# Altium PCB ESP32 with USBC  PCB V1I1.PcbDoc (part 3 of 3)
Units mil, origin at the board's own origin, x right, y up, seen from the top; angles counter-clockwise.
Board outline 2700 x 1000 mil, 4 copper layers (L1, L2, L3, L4), stack 61.581 mil thick; 64 components, 72 nets, 299 pads, 156 vias.
Unrouted connection lines stored in the file: 16.
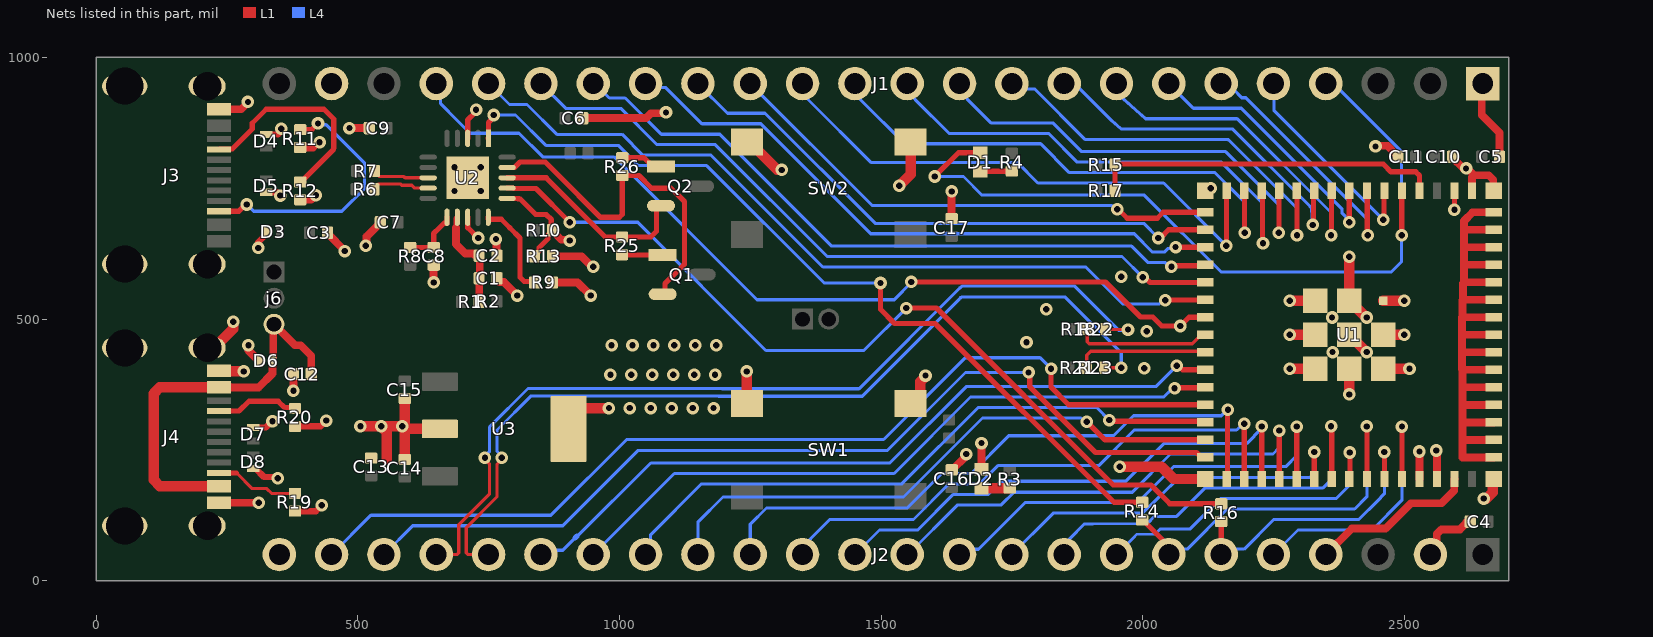
[diagram p4: the nets of this part, all layers, seen from the top]

## Via types
v1: diameter 24, hole 12, L1 to L4, tented both sides, 156 vias

## Nets (pads, with @x,y where several pads share a name; then routed paths per layer and width w, separated by ;. In a path a pad name is that pad's centre, name@x,y a point inside that pad or via, vN(x,y) a via of type N, cw(c..) or ccw(c..) an arc to the next point about the centre after c; other vN are vias at no path point) (continued)
CON_ESP_USB_N: J2.21 R22.1 | length 1727.3
  L1 w6.05: R22.1@1929.01,481 1930.01,480 v1(1972,480)
  L1 w6.23: J2.21@650,50 689.24,50 692.89,53.65 692.89,106.99 751.89,165.99 751.89,222.47 743,231.35 v1(743,235)
  L4 w6.23: v1(743,235) 743,238.65 751.89,247.53 751.89,293.89 825.34,367.34 1195.47,367.34 1195.9,366.92 1457.99,366.92 1650.5,559.43 cw(c1727.68,469.01) 1655.42,563.4 1869.6,563.4 1954.3,478.7 1970.7,478.7 v1(1972,480)
CON_ESP_USB_P: J2.20 R23.1 | length 1713.4
  L1 w6.23: J2.20@750,50 710.76,50 707.11,53.65 707.11,101.1 766.11,160.1 766.11,222.47 775,231.35 v1(775,235) ; R23.1@1927.02,407 v1(1959,407)
  L4 w6.23: v1(775,235) 775,238.65 766.11,247.53 766.11,287.99 831.24,353.11 1189.57,353.11 1190,352.69 1463.88,352.69 1647.32,536.12 ; 1647.35,536.15 1651.5,540.31 cw(c1655.89,535.89) 1655.89,542.11 1852.31,542.11 1959,435.43 v1(1959,407)
DTR_FTDI: Q2.2 R25.1 U2.18 | length 391
  L1 w10: 807.99,770.32 816.2,770.32 816.51,770 860,770 972.99,657.01 R25.1@1005,657.01 1060.01,657.01 1071,668 1071,710.28 1076.79,716.07 Q2.2@1080.1,716.07
  L1 w10.01: U2.18@785.41,770 807.67,770 807.99,770.32
ESP_USB_N: R18.2 R22.2 U1.23 | length 258.8
  L1 w6.23: R18.2@1895,481 1894,480 1894,456.65 1897.65,453 2094.57,453 2111.57,470 U1.23@2119.45,470
ESP_USB_P: R21.2 R23.2 U1.24 | length 254.6
  L1 w6.23: R21.2@1893,407 1893,431 1900.77,438.77 2117.21,438.77 U1.24@2119.45,436.54
FTDI_USB_N: R6.2 U2.9 | length 111.9
  L1 w6.23: R6.2@531.01,748 531.01,749.18 540.21,758.39 581.6,758.39 584.21,755.77 603.32,755.77 608.77,750.32 612.99,750.32 U2.9@634.59,750.32
FTDI_USB_P: R7.2 U2.8 | length 108.7
  L1 w6.23: R7.2@532.01,783 532.01,781.82 541.21,772.61 587.49,772.61 590.11,770 612.99,770 U2.8@634.59,770
GND: C1.2 C2.2 C3.2 C4.2 C5.2 C6.2 C7.2 C8.2 C9.2 C10.2 C11.2 C12.1 C12.2 C13.2 C14.2 C15.2 C16.2 C17.2 D2.2 D3.1 D4.1 D5.1 D6.1 D6.2 D7.1 D8.1 J1.1 J1.23 J2.2 J2.24 J3.A1B12 J3.S1 J3.S2 J3.S3 J3.S4 J4.+5V_VBUS2 J4.A1B12 J4.B1A12 J4.B4A9 J4.S1 J4.S2 J4.S3 J4.S4 j6.3 R9.2 R11.1 R12.1 R13.2 R19.1 R20.1 SW1.3 SW1.4 SW2.3 SW2.4 U1.1 U1.2 U1.42 U1.43 U1.46 U1.47 U1.48 U1.49 U1.50 U1.51 U1.52 U1.53 U1.54 U1.55 U1.56 U1.57 U1.58 U1.59 U1.60 U1.61 U1.62 U1.63 U1.64 U1.65 U1.66 U1.67 U1.68 U1.69 U1.70 U1.71 U1.72 U1.73 U2.3 U2.13 U2.21 U3.2 U3.4 | length 5788.2
  L1 w10: U1.2@2595.83,745.59 v1(2595.83,709.17) v1@2596,709
  L1 w10.01: U2.13@710,694.59 710.23,694.35 710.23,674.77 v1(730,655) ; U2.3@710,845.41 710,880.21 726,896.21 v1(726,900)
  L1 w12: D8.1@300,214.2 304.92,214.2 320.83,198.3 344.7,198.3 v1(347,196) ; v1(310,636) 310,646.87 325.2,662.08 D3.1@325.2,667 ; 312,292.8 324.43,292.8 336.63,305 v1(337,305) ; D5.1@325,742.2 345.8,742.2 v1(352,736) ; D4.1@325,852.8 346.97,852.8 354,859.82 v1(354,864) ; R19.1@380,132.99 420,133 v1(431,144) ; R20.1@380,295 428.99,295 v1(440,306.01)
  L1 w15: J4.B4A9@234.39,180.97 J4.B4A9@234.84,180.51 ; J4.B1A12@234.84,149.02 v1(310.98,149.02) ; J4.+5V_VBUS2@234.84,369.49 310.49,369.49 337.19,396.19 337.19,419.39 D6.2@337.8,420 338.41,420.61 338.41,488.41 j6.3@340,490 380,450 391,450 411.01,429.99 C12.1@411.01,395 ; J3.A1B12@234.84,900.98 277.06,900.98 290,913.93 v1(290,915) ; v1(291,450) 291,439.91 310.91,420 D6.1@312.2,420 ; v1(376.99,362.99) C12.2@376.99,395 ; R12.1@390,727.99 411.21,727.99 v1(420,736.78) ; R11.1@390.2,828.19 414.76,828.19 424.56,838 v1(427,838) ; C3.2@442.01,663.82 475,630.83 v1(475,630) ; v1(484,865) C9.2@521.99,865 ; v1(515,640) 516.72,641.72 516.72,657.55 539.86,680.69 539.86,681.87 C7.2@542.99,685 ; v1(645,570) C8.2@645,602.99 ; v1(764,653) 765,652 765,622 C2.2@766.01,621 ; C1.2@767.01,575 767.01,573.82 770.14,570.69 779.31,570.69 v1(805,545) ; R9.2@872.01,570 920,570 v1(945,545) ; R13.2@872.01,620 927.56,620 947.56,600 v1(950,600) ; C6.2@930.01,884 1051,884 1060.28,893.28 1087.28,893.28 v1(1089,895) ; C16.2@1635,212.01 1636.18,212.01 1661.28,237.1 1661.28,240.28 v1(1663,242) ; C17.2@1635,692.01 v1(1635,744) ; D2.2@1692,213 v1(1692,263) ; U1.63@2119.45,745.59 2125.59,745.59 v1(2130,750) ; v1(2445,830) 2446.36,831.36 2467.82,831.36 2484.86,814.31 2484.86,813.13 C11.2@2487.99,810 ; U1.42@2528.9,194.41 2528.9,246.9 v1(2529,247) ; J2.2@2550,50 2550,63.26 2562,75.26 2562,89.21 2570.79,98 2606.17,98 2618.99,110.82 C4.2@2618.99,112 ; v1(2561.18,248.82) 2562.36,247.64 U1.43@2562.36,194.41 ; C10.2@2592.01,810 2592.01,808.82 2612.83,788 v1(2618,788) 2620.44,788 2633.44,775 ; 2613.57,637.32 U1.58@2670.63,637.32 ; 2614.14,603.86 U1.57@2670.63,603.86 ; U1.1@2629.29,745.59 2629.38,745.68 2629.38,770.94 2633.44,775 ; J1.1@2650,950 2648,948 2648,890 2682.01,855.99 C5.2@2682.01,810 ; U1.65@2669,192.78 U1.65@2670.63,194.41 ; U1.46@2670.63,235.75 2611.25,235.75 2611.21,235.79 2611.21,269.21 ; U1.47@2670.63,269.21 2611.21,269.21 ; U1.48@2670.63,302.68 2611.32,302.68 ; U1.49@2670.63,336.14 2619.14,336.14 2619,336 2611,336 ; U1.50@2670.63,369.61 2611.39,369.61 2611,370 ; U1.51@2670.63,403.07 2612.07,403.07 2612,403 ; U1.52@2670.63,436.54 2610.46,436.54 ; U1.53@2670.63,470 2610,470 ; U1.54@2670.63,503.46 2611.54,503.46 2611,504 ; U1.55@2670.63,536.93 2612.07,536.93 ; U1.56@2670.63,570.39 2614.39,570.39 ; U1.59@2670.63,670.79 2614.21,670.79 2614,671 ; U1.60@2670.63,704.25 2630.66,704.25 2614,687.6 2614,671 ; U1.62@2670.63,745.59 2670,746.22 2670,766.21 2661.21,775 2633.44,775 ; 2610,470 2610,503 2611,504 ; 2610,470 2610,437 2610.46,436.54 ; 2610.46,436.54 2610.46,404.54 2612,403 ; 2611,336 2611,303 2611.32,302.68 ; 2611,336 2611,370 ; 2611,370 2611,402 2612,403 ; 2611,504 2611,535.86 2612.07,536.93 ; 2611.21,269.21 2611.21,302.57 2611.32,302.68 ; 2612.07,536.93 2612.07,568.07 2614.39,570.39 ; 2614,671 2614,570.79 2614.39,570.39
  L1 w20: J4.S1@212.2,445.08 225.78,445.08 262,481.3 v1(262,495) ; J4.B4A9@234.39,180.97 121.72,180.97 110,192.68 110,357.77 121.72,369.49 J4.+5V_VBUS2@234.84,369.49 J4.+5V_VBUS2@252.96,369.49 ; J4.A1B12@234.84,400.98 235.83,400 v1(282,400) ; v1@505.77,294.23 v1(505,295) v1(545,295) ; 555,232.01 555,283.92 545,293.92 v1(545,295) ; v1@585.77,294.68 586.08,295 591.08,290 U3.2@656.97,290 ; v1@585.77,295.32 585.77,296.85 590,301.08 C15.2@590,347.99 ; C14.2@590,232.01 590,288.92 585,293.92 v1(585,295) v1(545,295) ; U3.4@903.03,290 903.03,305.55 927.48,330 950,330 v1(980,330) ; SW1.4@1243.5,338.58 v1(1243.5,400) ; SW2.4@1243.5,838.58 1248.43,838.58 1301.24,785.77 1309.23,785.77 v1(1310,785) ; v1(1535,755) 1556.5,776.5 SW2.3@1556.5,838.58 ; SW1.3@1556.5,338.58 1559.13,338.58 1574.72,354.17 1574.72,380.64 1585,390.92 v1(1585,392) ; v1(1956,218) 2036,218 2059.59,194.41 U1.64@2119.45,194.41 ; v1(2281,405) v1(2281,405) U1.73@2330.08,405.04 ; v1(2281,470) U1.72@2330.08,470 ; v1(2281,535) v1(2281,535) U1.71@2330.08,534.96 ; v1(2395,356) v1(2395,356) U1.70@2395.04,405.04 ; U1.69@2395.04,470 v1(2428,437) ; v1(2395,619) U1.68@2395.04,534.96 2427,503 v1(2428,503) ; U1.67@2460,405.04 v1(2510,405) v1(2510,405) ; U1.66@2460,470 v1(2500,470) ; U1.61@2460,534.96 v1(2500,534.96) ; v1(2652,157) 2657,157 2669,169 U1.65@2669,192.78
  other v1: 1020,330 1060,330 1100,330 1140,330 1180,330 982.91,393.74 1022.91,393.74 1062.91,393.74 1102.91,393.74 1142.91,393.74 1182.91,393.74 2003,406 2363,437 985,450 1025,450 1065,450 1105,450 1145,450 1185,450 1778,456 2008,477 2362,503 1816,519 1959,581 685,745 735,745 685,790 735,790
GPIO0: R15.2 R17.2 U1.4 | length 670.8
  L1 w10: R17.2@1947.01,745 1947.01,796.18 2459.71,796.18 2474.53,781.36 2521.83,781.36 2528.9,774.29 U1.4@2528.9,745.59
GPIO1: D1.2 J1.4 U1.5 | length 1577.3
  L1 w10: v1(1602.5,772.5) 1648,818 D1.2@1690,818 ; v1(2495,660) 2495.22,660.22 2495.22,745.37 U1.5@2495.43,745.59
  L4 w6: v1(1602.5,772.5) 1657.5,772.5 1693,737 2003,737 2150,590 2475,590 2495,610 2495,820 2380.73,934.27 2380.35,934.27 2364.61,950 J1.4@2350,950
GPIO2: J1.5 U1.6 | length 411.3
  L1 w10: v1(2460,690) 2460.98,690.98 2460.98,744.61 U1.6@2461.97,745.59
  L4 w6: J1.5@2250,950 2260.33,939.67 2250.79,930.12 2250.79,899.21 v1(2460,690)
GPIO3: J1.6 U1.7 | length 503.9
  L1 w10: U1.7@2428.5,745.59 2429.25,744.84 2429.25,660.75 v1(2430,660)
  L4 w6: J1.6@2150,950 2160.33,939.67 2172.8,939.67 2189.47,923 2197,923 2428,692 2428,662 v1(2430,660)
GPIO4: J1.7 U1.8 | length 522.2
  L1 w10: v1(2395,685) U1.8@2395.04,745.59
  L4 w6: J1.7@2050,950 2097,903 2188.72,903 2380.79,710.93 2380.79,703 2395,688.79 v1(2395,685)
GPIO5: J1.8 U1.9 | length 650.5
  L1 w10: v1(2360,660) 2360.79,660.79 2360.79,744.8 U1.9@2361.57,745.59
  L4 w6: J1.8@1950,950 1951.2,931.29 1954.09,928.4 1986.35,900.02 2005.88,883 2180.43,883 2360.79,702.64 2360.79,660.79 v1(2360,660)
GPIO6: J1.9 U1.10 | length 669.3
  L1 w10: v1(2325,680) 2326.56,681.56 2326.56,744.04 U1.10@2328.11,745.59
  L4 w6: J1.9@1850,950 1871.46,948.53 1939.76,880.24 1940,880 1959.51,863 2172.15,863 2314.97,720.18 2322.99,712.01 v1(2325,680)
GPIO7: J1.10 U1.11 | length 781.2
  L1 w10: U1.11@2294.65,745.59 2294.82,745.41 2294.82,660.18 v1(2295,660)
  L4 w6: J1.10@1750,950 1760.33,939.67 1793.86,939.67 1890.53,843 2163.86,843 2166.79,840.07 2191.86,815 2295,711.86 v1(2295,660)
GPIO8: J1.11 U1.12 | length 850.3
  L1 w10: v1(2260,665) 2260.59,665.59 2260.59,745 U1.12@2261.18,745.59
  L4 w6: J1.11@1650,950 1650,935.39 1665.73,919.65 1665.73,919.27 1710,875 1828.28,875 1883.28,820 2158.58,820 2261.18,717.4 2261.18,666.18 v1(2260,665)
GPIO9: J1.12 U1.13 | length 960.8
  L1 w10: U1.13@2227.72,745.59 2228.86,744.45 2228.86,646.14 v1(2230,645)
  L4 w6: J1.12@1550,950 1550,935.39 1565.73,919.65 1565.73,919.27 1630,855 1820,855 1875,800 2150.29,800 2230,720.29 v1(2230,645)
GPIO10: J1.13 U1.14 | length 989.8
  L1 w10: U1.14@2194.25,745.59 2194.63,745.22 2194.63,665.37 v1(2195,665)
  L4 w6: J1.13@1450,950 1460.33,939.67 1460.33,919.67 1545,835 1805,835 1860,780 2138.18,780 2195,723.18 v1(2195,665)
GPIO11: J1.14 U1.15 | length 1056
  L1 w10: v1(2160,640) 2160.39,640.39 2160.39,745.2 U1.15@2160.79,745.59
  L4 w6: J1.14@1350,950 1360.33,939.67 1360.33,919.67 1480.5,799.5 1760.32,799.5 1799.82,760 2040,760 v1(2160,640)
GPIO12: J1.15 U1.16 | length 980.7
  L1 w10: v1(1951.7,710) 1953.41,710 1970.57,692.83 2027.83,692.83 2039.21,704.21 2119.4,704.21 U1.16@2119.45,704.25
  L4 w6: J1.15@1250,950 1483,717 1940.92,717 1947.92,710 v1(1951.7,710)
GPIO13: J1.16 U1.17 | length 1098.2
  L1 w10: v1(2030,655) 2033.79,655 2049.58,670.79 U1.17@2119.45,670.79
  L4 w6: J1.16@1150,950 1206.64,893.36 1278.36,893.36 1488.72,683 2002,683 v1(2030,655)
GPIO14: J1.17 U1.18 | length 1206.9
  L1 w10: v1(2062.96,637.59) 2063.22,637.32 U1.18@2119.45,637.32
  L4 w6: J1.17@1050,950 1057.73,942.27 1088.73,942.27 1157.64,873.36 1270.07,873.36 1480.43,663 1983.82,663 2018.82,628 2041.18,628 2047.77,634.59 2048.09,634.91 2060.28,634.91 v1(2062.96,637.59)
GPIO15: J1.18 U1.19 | length 1316
  L1 w10: v1(2055,600) 2056.93,601.93 2117.52,601.93 U1.19@2119.45,603.86
  L4 w6: J1.18@950,950 953.43,950 980.81,922.62 1010.91,922.62 1080.17,853.36 1191.64,853.36 1405.48,639.52 1979.01,639.52 2010.53,608 2043.21,608 2051.21,600 v1(2055,600)
GPIO16: J1.19 U1.20 | length 1427
  L1 w10: v1(2000,580) 2003.79,580 2013.79,570 2119.06,570 U1.20@2119.45,570.39
  L4 w6: J1.19@850,950 897.38,902.62 1002.62,902.62 1071.89,833.36 1183.36,833.36 1397.2,619.52 1960.48,619.52 v1(2000,580)
GPIO17: J1.20 U1.21 | length 1547.1
  L1 w10: v1(2043,536) 2043.46,536.46 2118.98,536.46 U1.21@2119.45,536.93
  L4 w6: J1.20@750,950 790,910 823.53,910 880.53,853 1005.18,853 1044.83,813.36 1175.07,813.36 1388.91,599.52 1891.49,599.52 1962.01,529 2032.21,529 2039.21,536 v1(2043,536)
GPIO18: J1.21 U1.22 | length 1714.7
  L1 w10: v1(1558,571) 1929,571 1996,504 2019.18,504 2036.42,486.76 v1(2072,486.76) 2088.7,503.46 U1.22@2119.45,503.46
  L4 w6: J1.21@650,950 658.23,941.77 658.23,911.77 690.41,879.59 714.75,855.25 807.99,855.25 853.24,810 990,810 1263,537 1525.18,537 1558,569.82 v1(1558,571)
GPIO21: J2.19 U1.25 | length 1421.8
  L1 w10: v1(2065,411) 2068.79,411 2076.72,403.07 U1.25@2119.45,403.07
  L4 w6: J2.19@850,50 858.23,58.23 891.77,58.23 913.98,80.25 915.14,81.53 ; 918.79,85.14 920.08,86.29 1057.14,222.1 1060.06,225 1516.72,225 1662.72,371 2025,371 v1(2065,411)
  L4 w10: 915.14,81.53 cw(c950,50) 918.79,85.14
GPIO26: J2.18 U1.26 | length 1301.8
  L1 w10: v1(2061,368) 2061.8,368.8 2118.65,368.8 U1.26@2119.45,369.61
  L4 w6: J2.18@950,50 1105,205 1525,205 1671,351 2040.21,351 2057.21,368 v1(2061,368)
GPIO33: J2.17 U1.28 | length 1214
  L1 w10: v1(1936,307) 1938.16,304.84 2117.29,304.84 U1.28@2119.45,302.68
  L4 w6: J2.17@1050,50 1059.23,59.23 1059.23,87.23 1157,185 1539.53,185 1685.53,331 1912,331 v1(1936,307)
GPIO34: J2.16 U1.29 | length 1131.2
  L1 w10: v1(1893,304) 1927.79,269.21 U1.29@2119.45,269.21
  L4 w6: J2.16@1150,50 1150,112 1198,160 1542.82,160 1651.82,269 1652,269 1694,311 1882.21,311 1889.21,304 v1(1893,304)
GPIO35: J2.15 U1.31 | length 1195.2
  L1 w10: U1.31@2160.79,194.41 2161.89,195.52 2161.89,325.89 v1(2163,327)
  L4 w6: J2.15@1250,50 1250,108 1281,139 1550.1,139 1616.1,205 1672.18,205 1744.18,277 1944.18,277 1982.5,315.32 2150.14,315.32 2161.82,327 v1(2163,327)
GPIO36: J2.14 U1.32 | length 1062
  L1 w10: v1(2194,300) 2194.13,299.87 2194.13,194.54 U1.32@2194.25,194.41
  L4 w6: J2.14@1350,50 1350,64.61 1365.73,80.35 1365.73,80.73 1402,117 1562,117 1630,185 1688.28,185 1723.28,220 1916,220 1984,288 2179.61,288 2191.61,300 v1(2194,300)
GPIO37: J2.13 U1.33 | length 981.8
  L1 w10: U1.33@2227.72,194.41 v1(2227.72,294.84)
  L4 w6: J2.13@1450,50 1497,97 1570.28,97 1638.28,165 1705,165 1730,190 1968,190 2040.1,262.1 2198.77,262.1 2227.72,291.05 v1(2227.72,294.84)
GPIO38: J2.12 U1.34 | length 921.2
  L1 w10: v1(2261,287) 2261.09,286.91 2261.09,194.5 U1.34@2261.18,194.41
  L4 w6: J2.12@1550,50 1551.57,50 1646.57,145 1730,145 1754.17,169.17 1980.17,169.17 2053.1,242.1 2249.1,242.1 2261,254 v1(2261,287)
GPIO39: J2.11 U1.35 | length 878.7
  L1 w10: U1.35@2294.65,194.41 v1(2294.65,294.65)
  L4 w6: J2.11@1650,50 1660.23,60.23 1686.23,60.23 1775.17,149.17 1990.17,149.17 2059,218 2273.43,218 2294.65,239.21 v1(2294.65,294.65)
GPIO40: J2.10 U1.36 | length 733.5
  L1 w10: U1.36@2328.11,194.41 v1(2328.11,246)
  L4 w6: J2.10@1750,50 1826.24,126.24 1829.17,129.17 1998.93,129.17 2069.48,197 2319,197 2328.11,206.11 v1(2328.11,246)
GPIO41: J2.9 U1.37 | length 783.8
  L1 w10: v1(2360,295) 2361.57,293.43 U1.37@2361.57,194.41
  L4 w6: J2.9@1850,50 1860.33,60.33 1860.33,80.33 1887.85,107.85 1888.26,108.26 1905.38,108.26 2008.71,109.13 2022.59,123 2065,123 2119,177 2344,177 2360,193 v1(2360,295)
GPIO42: J2.8 U1.38 | length 613.6
  L1 w10: U1.38@2395.04,194.41 2396,195.37 v1(2396,245)
  L4 w6: J2.8@1950,50 1985.33,85.33 1985.45,85.45 1988.26,88.26 2024.14,89.3 2034.04,99 2091,99 2149,157 2370,157 2396,183 v1(2396,245)
GPIO45: J2.5 U1.41 | length 529.6
  L1 w10: U1.41@2495.43,194.41 v1(2495.43,294.57)
  L4 w6: J2.5@2250,50 2297,97 2439,97 2495.43,153.43 v1(2495.43,294.57)
GPIO46: J2.4 U1.44 | length 318.3
  L1 w15: J2.4@2350,50 2399.5,99.5 2464.14,99.5 2512.64,148 2571,148 2595.45,172.45 2595.45,194.04 U1.44@2595.83,194.41
GPIO47: J2.23 U1.27 | length 1882.9
  L1 w10: v1(1825,405) 1825,370 1858.86,336.14 U1.27@2119.45,336.14
  L4 w6: J2.23@450,50 525,125 869,125 1014,270 1505,270 1661,426 1804,426 v1(1825,405)
GPIO48: J2.22 U1.30 | length 1795.8
  L1 w10: v1(1782,398) 1784,396 1784,371 1910,245 2102.84,245 2108.7,239.14 2108.7,238.62 2111.57,235.75 U1.30@2119.45,235.75
  L4 w6: J2.22@550,50 605,105 892,105 1036,249 1512.43,249 1661.43,398 v1(1782,398)
NetC8_1: C8.1 R8.2 U2.11 | length 120.8
  L1 w10: R8.2@600,637.01 600,640 602.99,637.01 C8.1@645,637.01 645,663.34 656.24,674.59 664.71,683.06 670.4,683.06 670.63,683.28 U2.11@670.63,694.59
NetD1_1: D1.1 R4.1 | length 59.7
  L1 w10: D1.1@1690,782 1690.5,782.5 R4.1@1749.5,782.5
NetD2_1: D2.1 R3.1 | length 54
  L1 w20: D2.1@1692,177 R3.1@1746,176.99
NetJ3_A5: J3.A5 R12.2 | length 412.6
  L1 w10: J3.A5@234.84,824.21 235.75,825.12 260.16,825.12 273,837.96 298.19,863.14 298.19,874.19 325,901 435.18,901 454,882.18 454,826.82 453.5,826.32 453.5,824.33 391.18,762.01 R12.2@390,762.01
NetJ3_B5: J3.B5 R11.2 | length 514.6
  L1 w10: J3.B5@234.84,706.1 272.48,706.1 273,706.62 285.38,719 v1(288,719) ; R11.2@390,862.01 412.01,862.01 v1(424,874)
  L4 w6: v1(288,719) 300.9,706.1 469.53,706.1 513,749.57 513,797.82 439.5,871.32 426.68,871.32 v1(424,874)
NetJ4_A5: J4.A5 R20.2 | length 158.7
  L1 w10: J4.A5@234.84,324.21 273.21,324.21 292,343 347.83,343 359.86,330.97 378.05,330.97 R20.2@380,329.02
NetJ4_B5: J4.B5 R19.2 | length 161.4
  L1 w6: 268.19,206.1 298.27,176.02 326.19,176.02 335.2,167.01 R19.2@380,167.01
  L1 w10: J4.B5@234.84,206.1 268.19,206.1
NetQ1_1: Q1.1 R25.2 | length 77.8
  L1 w10.01: R25.2@1005,622.99 1005.3,622.7 1082.28,622.7 Q1.1@1082.58,622.4
NetQ2_1: Q2.1 R26.2 | length 81
  L1 w10: R26.2@1005.57,808.45 1047.07,808.45 1064.08,791.44 Q2.1@1079.53,791.44
NetR9_1: R9.1 U2.15 | length 186.2
  L1 w10: U2.15@749.37,694.59 749.37,691.16 749.6,690.94 774.06,690.94 790.41,674.59 810,655 810,580 818.22,571.78 836.21,571.78 R9.1@837.99,570
RTS_FTDI: Q1.2 R26.1 U2.19 | length 678.3
  L1 w10: U2.19@785.41,789.68 799.79,789.68 810.1,800 858.3,800 879.68,778.61 963.84,694.44 999.71,694.44 1005.57,700.3 R26.1@1005.57,774.43 1037.35,774.43 1061.78,750 1098.76,750 1124.29,724.47 1124.29,604.93 1087.37,568 1087.37,552.39 Q1.2@1082.58,547.6
RXD_FTDI: R14.2 U2.1 | length 1624
  L1 w10: U2.1@749.37,845.41 749.6,845.64 749.6,875.81 760,886.21 v1(760,890) ; v1(1499,569) 1499,518.67 1525.86,491.82 1603.18,491.82 1944.99,150.01 R14.2@1999,150.01
  L4 w6: v1(760,890) 801.52,890 859.52,832 997.9,832 1036.54,793.36 1166.79,793.36 1391.15,569 v1(1499,569)
TXD_FTDI: R16.2 U2.17 | length 1681.6
  L1 w10: U2.17@785.41,750.32 796.72,750.32 797.61,749.42 807.99,749.42 840.58,749.42 v1(905,685) ; v1(1548,521) 1605.72,521 1943.72,183 2016,183 2051.99,147.01 R16.2@2150,147.01
  L4 w6: v1(905,685) 1035,685 1280,440 1467,440 v1(1548,521)
U0RXD: J2.6 R16.1 U1.40 | length 554.7
  L1 w10: J2.6@2150,50 R16.1@2150,112.99 ; U1.40@2461.97,194.41 v1(2461.97,245.97)
  L4 w6: J2.6@2150,50 2160.33,60.33 2193.86,60.33 2250.53,117 2413.29,117 2448.15,151.85 2448.15,152.15 2461.97,165.97 v1(2461.97,245.97)
U0TXD: J2.7 R14.1 U1.39 | length 746.9
  L1 w10: R14.1@1999,115.99 2000.18,115.99 2039.67,76.51 2039.67,60.33 J2.7@2050,50 ; U1.39@2428.5,194.41 v1(2428.5,294.88)
  L4 w6: J2.7@2050,50 2060.33,60.33 2085.33,60.33 2162,137 2405.01,137 2428.5,160.5 v1(2428.5,294.88)
VBUS_SENSE: R10.1 R13.1 U2.16 | length 227
  L1 w10: U2.16@785.41,730.63 804.94,730.63 cw(c804.94,726.31) 807.99,729.37 810.64,729.36 840,700 860,700 869.96,690.04 869.96,672.05 R10.1@872.01,670 ; R13.1@837.99,620 837.99,621.18 846.38,629.57 846.38,636.47 856.72,646.81 856.9,646.81 863.62,653.53 863.62,660.43 R10.1@872.01,668.82
  L1 w15: R10.1@872.01,670 872.01,668.82 889.1,651.72 903.28,651.72 v1(905,650)
VCC-FTDI: C1.1 C2.1 R1.2 R2.2 U2.12 | length 187.1
  L1 w10.01: 687.73,674.59 687.73,692 U2.12@690.32,694.59
  L1 w15: 687.73,674.59 687.73,643.27 705.5,625.5 720.68,625.5 C2.1@730,616.18 ; C2.1@730,615 732.99,612.01 C1.1@732.99,575 ; R2.2@732.01,534 C1.1@732.01,574.02
pads on no net: J1.24 J3.A8 J3.B1A12 J3.B8 J4.A8 J4.B8 U2.2 U2.4 U2.5 U2.6 U2.7 U2.14

## Polygon pours and split planes (outlines as drawn)
GND on L1 "GND_L01_P015" (solid, pour order 15): 2686,764 2621,764 2621,710 2614,687.6 2605,673 2604,672 2604,228 2687,228 2686,229
GND on L1 "GND_L01_P010" (solid, pour order 10): 1260.74,472.76 1295.54,437.96 1295.54,284.49 1251.99,284.49 1173,205.5 863,205.5 863,273 710.5,273 658.48,252.32 611.75,233.75 611.12,218.26 698.91,220.88 492,222.39 492,341.2 563.95,341.2 579.16,358.57 600.02,358.57 612.98,341.2 721.87,340.72 723.62,342.33 750.5,366.91 750.5,472.76
+5V on L1 "+5V_L01_P005" (solid, pour order 5): 675.55,610.53 696.59,610.53 710,597.12 710,357.86 645,357.86 614,357.86 604,370 576.1,370.68 564.4,357.86 458.59,357.86 458.59,419.41 358.33,519.67 307.79,519.67 307.79,538.35 307.79,560 452.19,560 485,528.06 628.59,527.53 648.06,547 674.44,547
+3V3-FTDI on L1 "+3V3-FTDI_L01_P003" (solid, pour order 3): 612.18,616.01 612.18,590.98 561.18,590.98 559.18,590.98 557.18,590.98 554.18,590.98 547.18,597.98 547.18,648.98 564,665.8 564,712.8 589.18,737.98 601.18,737.98 601.18,719.98 601.18,668.09 574.82,648.83 574.82,616.01
GND on L1 "GND_L01_P009" (solid, pour order 9): 2250,635 2515,635 2545,635 2545,340 2250,340
GND on L1 "GND_L01_P008" (solid, pour order 8): 320,509 355,509 423,441 423,350 362,350 318.5,393.5 326,401 326,436 322,440 320,440
+5V_VBUS1 on L1 "+5V_VBUS1_L01_P006" (solid, pour order 6): 343,685 419,685 419,570 320,570 320,610 330,620 343,620
+3V3_REG on L1 "+3V3_REG_L01_P004" (solid, pour order 4): 699,218.03 699,162.59 678,141.59 483.41,141.59 483,142 483,207.59 486.23,210.81 540.05,210.81 620.23,210.81 611.55,218.03 525.67,217.42
+3V3-FTDI on L1 "+3V3-FTDI_L01_P002" (solid, pour order 2): 908.87,870.8 908.87,838.01 915.04,830.79 915.04,824.22 915.04,799.73 942.04,776.27 942.04,759.27 915.04,759.27 914.04,758.27 914.04,765.79 882.04,797.79 882.04,870.8
+3V3 on L1 "+3V3_L01_P000" (solid, pour order 0): 2510,797.97 2572,797.97 2572,836.97 2577,841.97 2577,864.97 2577,866.97 2518,866.97 2518,855.97 2510,847.97
GND on L2 "GND_L02_P014" (solid, remove dead copper, pour order 14): 2685,975 2685,20 15,20 15,990
+3V3 on L2 "+3V3_L02_P012" (solid, remove dead copper, pour order 12): 2685,20 2220,20 2220,120 2440,120 2532,212 2532,780 1920,780 1860,720 1860,597 1720,457 1720,380 1840,260 1794.5,214.5 1569,440 1380.34,440 1380,520 1380,530 1282,580 1240,580 900,580 900,540 840,480 760,480 760,760 760,780 800,840 800,985 2685,985
+3V3_REG on L2 "+3V3_REG_L02_P013" (solid, pour order 13): 700,210 700,125 485,125 485,210
GND on L3 (split plane): 2699.95,0.05 0.05,0.05 0.05,999.95 2699.95,999.95

## Silkscreen, mask and mechanical layers (free items; w line width, h text height)
Top Overlay:
  lines w6: 477,727 477,805 ; 553,728 553,805 ; 677,554.82 784.18,554.82 ; 711.01,600 786,600
  text "USER LED" at 1665,870 h20
  text "J1" at 2345,820 h50
  text "BOOT/USR" at 1295,585 h30
  text "USB1" at 400,575 h30
  text "UART" at 85,545 h30
  text "+5V" at 400,510 h30
  text "3V3" at 1465,500 h30
  text "REG" at 1205,495 h30
  text "ESP" at 91,479 h30
  text "USB2" at 400,450 h30
  text "RESET" at 1325,385 h30
  text "POWER LED" at 1675,270 h20
  text "J2" at 2368,113 h50
Bottom Overlay:
  text "IO0" at 2390,1600 h30 r90
  text "NC" at 365,890 h30 r90
  text "GND" at 465,890 h30 r90
  text "+5V" at 560,890 h30 r90
  text "IO18" at 660,890 h30 r90
  text "IO17" at 760,890 h30 r90
  text "IO16" at 860,890 h30 r90
  text "IO15" at 965,890 h30 r90
  text "IO14" at 1060,890 h30 r90
  text "IO13" at 1160,890 h30 r90
  text "IO12" at 1260,890 h30 r90
  text "IO11" at 1360,890 h30 r90
  text "IO10" at 1465,890 h30 r90
  text "IO9" at 1560,890 h30 r90
  text "IO8" at 1665,890 h30 r90
  text "IO7" at 1760,890 h30 r90
  text "IO6" at 1865,890 h30 r90
  text "I05" at 1960,890 h30 r90
  text "IO4" at 2065,890 h30 r90
  text "IO3" at 2165,890 h30 r90
  text "IO2" at 2265,890 h30 r90
  text "IO1" at 2370,885 h30 r90
  text "IO0" at 2470,885 h30 r90
  text "IO0" at 2470,885 h30 r90
  text "3V3" at 2555,885 h30 r90
  text "GND" at 2665,885 h30 r90
  text "<------PIN1------>" at 2665,755 h30 r90
  text "COPY RIGHT HOSSEIN BAHREMAND 2026/06/26" at 1950,515 h30
  text "ESP_N" at 660,250 h30 r90
  text "ESP_P" at 760,250 h30 r90
  text "IO45" at 2275,220 h30 r90
  text "IO46" at 2365,220 h30 r90
  text "IO47" at 465,215 h30 r90
  text "IO48" at 565,215 h30 r90
  text "IO26" at 970,215 h30 r90
  text "IO33" at 1070,215 h30 r90
  text "IO34" at 1165,215 h30 r90
  text "IO35" at 1260,215 h30 r90
  text "IO36" at 1365,215 h30 r90
  text "IO37" at 1465,215 h30 r90
  text "IO38" at 1570,215 h30 r90
  text "IO39" at 1665,215 h30 r90
  text "IO40" at 1765,215 h30 r90
  text "IO42" at 1970,215 h30 r90
  text "CHIP" at 2470,215 h30 r90
  text "IO21" at 860,205 h30 r90
  text "IO41" at 1865,205 h30 r90
  text "IO0" at 2609.02,194.69 h30 r270
  text "GND" at 365,190 h30 r90
  text "3V3" at 2665,190 h30 r90
  text "GND" at 2561.98,189.31 h30 r90
  text "TX" at 2065,160 h30 r90
  text "RX" at 2165,160 h30 r90
Top Solder:
  region: 1239 vertices and 4 holes, not listed, extent 974.9,208.97 1180.9,395.51
Board Shape:
  lines w20: -5,10 -5,995 0,1000 2695,1000 2695,0 5,0 -5,10

## Text inside footprints (layer, text, board x,y; h text height)
J1: Bottom Overlay "1" at 2631,866 h40 r270
J2: Bottom Overlay "1" at 2631,-34 h40 r270
J5: Top Overlay "1" at 1363,432 h40 r90
j6: Top Overlay "1" at 272,577 h40